# EAGLE board The_project v138 (EAGLE 9.7.0)
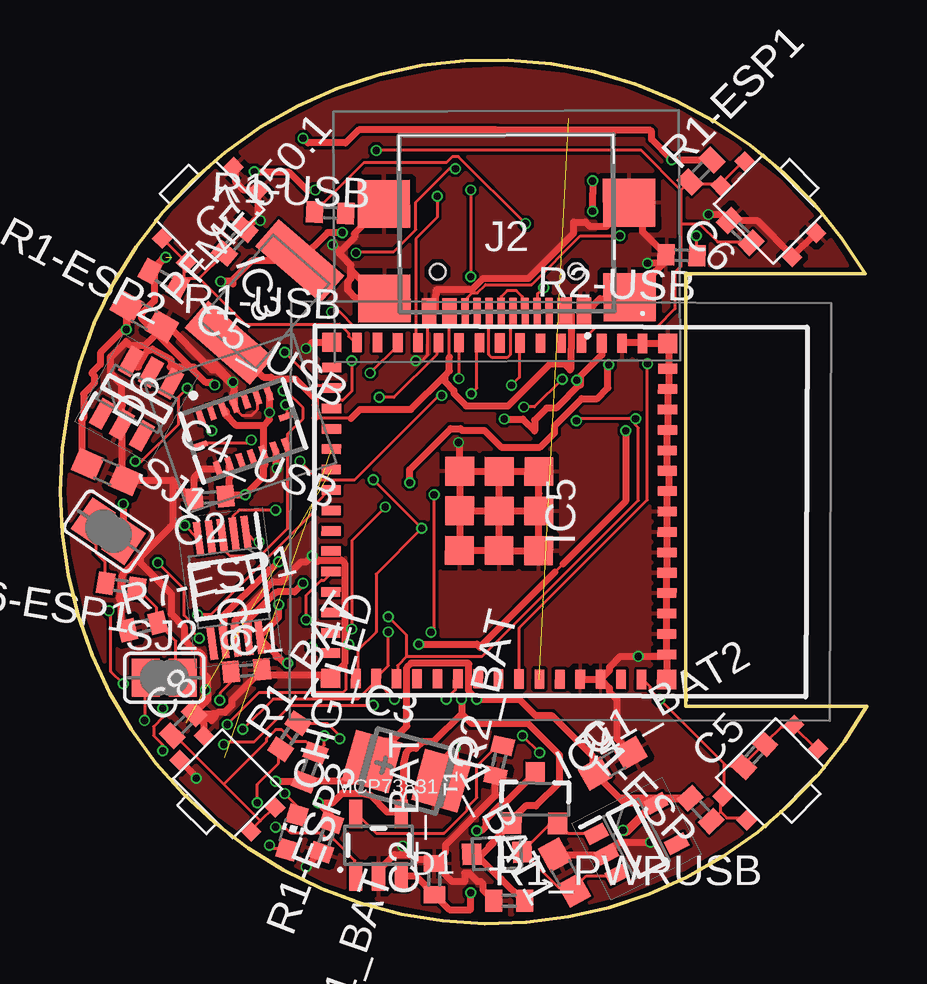
[diagram p0: board, top side]
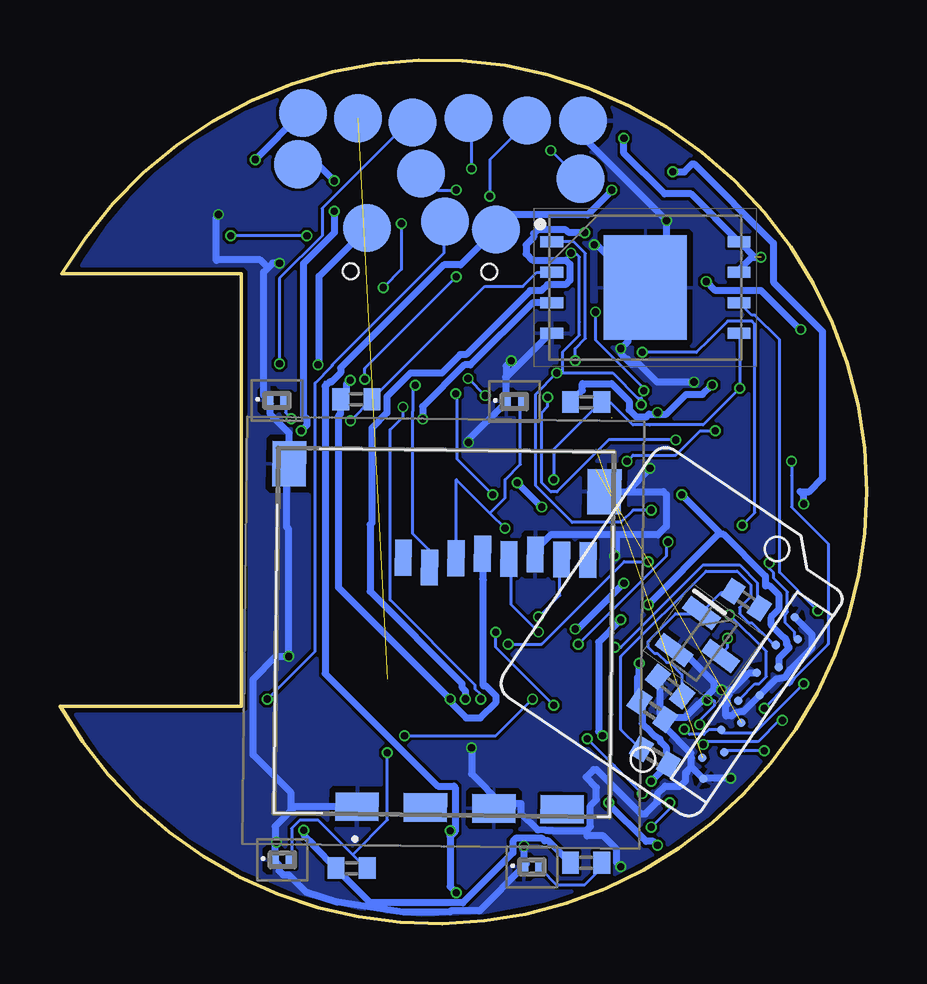
[diagram p1: board, bottom side, seen from below]

Size 33.62 x 35.98 mm. Coordinates in mm from the lower left corner, seen from the top.
Outline: 0,18 arc150 33.62,9.06 26.08,9.06 26.08,27.07 33.54,27.07 arc150 0,18
Copper layers (1*16): Top / Bottom
Stack-up Default Layer Stack: Top User Defined 0.035mm / Dielectric-1 User Defined 1.6mm / Bottom User Defined 0.035mm
Design rules: minimum copper width 5mil, minimum drill size 0.3mm, copper clearance wire_polygon to wire_polygon 5mil, copper clearance wire_polygon to pad_smd 5mil, copper clearance wire_polygon to via 5mil, copper clearance pad_smd to pad_smd 5mil, copper clearance pad_smd to via 5mil, copper clearance via to via 5mil, copper clearance smd to pad (same net) 5mil, copper clearance smd to via (same net) 5mil, copper clearance smd to smd (same net) 5mil, dimension clearance 0.2mm, via restrict clearance 0mil, restrict clearance 0mil, drill distance 6mil, keepout clearance 0mil

## Footprints (pad centres in the part's own frame; a part is rotated, then mirrored left to right if it is on the bottom)
RRR = smd 0.62 x 0.6: P$1 -2.1,0.71; P$2 -2.1,-0.71; P$3 2.1,0.71; P$4 2.1,-0.71
EAGLE-LTSPICE_C0402 = smd 0.7 x 0.9: 1 -0.65,0; 2 0.65,0
RCL_C0603 = smd 1.1 x 1: 1 -0.85,0; 2 0.85,0
CT3528 = smd 2 x 2.2: + -1.5,0; - 1.5,0
ADAFRUIT_CHIP-LED0603 = smd 0.8 x 0.8: A 0,-0.75; C 0,0.75
AVX---SD0805S020S1R0_AVX_SD0805S020S1R0_0 = smd 0.8 x 0.9: 1 -1.05,0; 2 1.05,0
PESD5V0S1BL315 = smd 0.4 x 0.7: 1 -0.35,0; 2 0.35,0
SOT95P280X145-6N = smd 1.2 x 0.6: 1 -1.25,0.95; 2 -1.25,0; 3 -1.25,-0.95; 4 1.25,-0.95; 5 1.25,0; 6 1.25,0.95
SON127P800X600X80-9N = smd 0.95 x 0.45: 1 -3.9,1.905; 2 -3.9,0.635; 3 -3.9,-0.635; 4 -3.9,-1.905; 5 3.9,-1.905; 6 3.9,-0.635; 7 3.9,0.635; 8 3.9,1.905 | smd 3.45 x 4.35: 9 0,0
BMI085 = smd 0.675 x 0.25: 1 1.165,1.5; 2 1.165,1; 3 1.165,0.5; 4 1.165,0; 5 1.165,-0.5; 6 1.165,-1; 7 1.165,-1.5; 9 -1.165,-1.5; 10 -1.165,-1; 11 -1.165,-0.5; 12 -1.165,0; 13 -1.165,0.5; 14 -1.165,1; 15 -1.165,1.5 | smd 0.25 x 0.675: 8 0,-1.915; 16 0,1.915
SOT95P280X120-5N = smd 0.9 x 0.6: 1 -1.4,0.95; 2 -1.4,0; 3 -1.4,-0.95; 4 1.4,-0.95; 5 1.4,0.95
ESP32S3MINI1N8 = smd 0.8 x 0.4: 1 -7,5.95; 2 -7,5.1; 3 -7,4.25; 4 -7,3.4; 5 -7,2.55; 6 -7,1.7; 7 -7,0.85; 8 -7,0; 9 -7,-0.85; 10 -7,-1.7; 11 -7,-2.55; 12 -7,-3.4; 13 -7,-4.25; 14 -7,-5.1; 15 -7,-5.95; 31 7,-5.95; 32 7,-5.1; 33 7,-4.25; 34 7,-3.4; 35 7,-2.55; 36 7,-1.7; 37 7,-0.85; 38 7,0; 39 7,0.85; 40 7,1.7; 41 7,2.55; 42 7,3.4; 43 7,4.25; 44 7,5.1; 45 7,5.95 | smd 0.4 x 0.8: 16 -5.95,-7; 17 -5.1,-7; 18 -4.25,-7; 19 -3.4,-7; 20 -2.55,-7; 21 -1.7,-7; 22 -0.85,-7; 23 0,-7; 24 0.85,-7; 25 1.7,-7; 26 2.55,-7; 27 3.4,-7; 28 4.25,-7; 29 5.1,-7; 30 5.95,-7; 46 5.95,7; 47 5.1,7; 48 4.25,7; 49 3.4,7; 50 2.55,7; 51 1.7,7; 52 0.85,7; 53 0,7; 54 -0.85,7; 55 -1.7,7; 56 -2.55,7; 57 -3.4,7; 58 -4.25,7; 59 -5.1,7; 60 -5.95,7 | smd 1.2 x 1.2: 61 0,0; 66 -1.65,1.65; 67 -1.65,0; 68 -1.65,-1.65; 69 0,-1.65; 70 1.65,-1.65; 71 1.65,0; 72 1.65,1.65; 73 0,1.65 | smd 0.8 x 0.8: 62 -7,7; 63 -7,-7; 64 7,-7; 65 7,7
SOP50P490X110-10N = smd 1.4 x 0.3: 1 -2.2,1; 2 -2.2,0.5; 3 -2.2,0; 4 -2.2,-0.5; 5 -2.2,-1; 6 2.2,-1; 7 2.2,-0.5; 8 2.2,0; 9 2.2,0.5; 10 2.2,1
LCD = smd 0.35 x 0.35: P$1 4,3.35; P$2 4.62,2.65; P$3 4,1.95; P$4 4.62,1.25; P$5 4,0.55; P$6 4.62,-0.15; P$7 4,-0.85; P$8 4.62,-1.55; P$9 4.1,-2.25; P$10 4.72,-2.95; P$11 4.1,-3.65; P$12 4.62,-4.35
USB4110GFA = smd 0.3 x 1.15: A1 -3.35,3.678; A4 -2.55,3.678; A5 -1.25,3.678; A6 -0.25,3.678; A7 0.25,3.678; A8 1.25,3.678; A9 2.55,3.678; A12 3.4,3.678; B1 3.1,3.678; B4 2.25,3.678; B5 1.75,3.678; B6 0.75,3.678; B7 -0.75,3.678; B8 -1.75,3.678; B9 -2.25,3.678; B12 -3.05,3.678 | smd 2.18 x 2: MP1 -5.11,-0.827; MP2 5.11,-0.827; MP3 -5.11,3.103; MP4 5.11,3.103 | hole 0.65: -2.89,2.003; 2.89,2.003
112ATAARR03ATTEND = smd 1.8 x 1.2: G1 10.6,10.4; G2 4.9,10.4; S1 7.75,10.4; S2 2.05,10.4 | smd 1.4 x 1.9: G3 13.6,-3.85; G4 0.45,-2.85 | smd 0.7 x 1.5: P1 8.8,0; P2 7.7,0.4; P3 6.6,0; P4 5.5,-0.2; P5 4.4,0; P6 3.3,-0.2; P7 2.2,0; P8 1.1,0
SPARKFUN-IC-POWER_SOT23-5 = smd 0.55 x 1.2: 1 -0.95,-1.3; 2 0,-1.3; 3 0.95,-1.3; 4 0.95,1.3; 5 -0.95,1.3
VARISTOR_CT/CN1812 = smd 1.5 x 3.6: 1 -2.25,0; 2 2.25,0
SOT96P240X120-3N = smd 1.55 x 0.65: 1 -0.85,0.96; 2 -0.85,-0.96; 3 0.85,0
EAGLE-LTSPICE_R0402 = smd 0.7 x 0.9: 1 -0.65,0; 2 0.65,0
SJ = smd 1.168 x 1.6: 1 -0.762,0; 2 0.762,0
SPARKFUN-DISCRETESEMI_SOT23-3 = smd 0.8 x 0.9: 1 -0.95,-1; 2 0.95,-1; 3 0,1.1
TP20R = smd 2 x 2: TP 0,0

## Placement (x,y rotation side)
BUTTON1  [RRR]  6.25,29.53 225 top
BUTTON2  [RRR]  6.98,5.83 315 top
BUTTON3  [RRR]  29.6,6.29 45 top
BUTTON4  [RRR]  29.52,29.77 135 top
C1  1uF  [EAGLE-LTSPICE_C0402]  7.77,10.55 5.2 top
C1_BAT  4.7uF  [EAGLE-LTSPICE_C0402]  11.09,3.58 251 top
C1_BAT1  4.7uF  [RCL_C0603]  21.02,2.12 118.7 top
C1_BAT2  4.7uF  [RCL_C0603]  23.03,6.68 30.2 top
C2  1uF  [EAGLE-LTSPICE_C0402]  6.25,17.76 184.8 top
C2_BAT  4.7uF  [EAGLE-LTSPICE_C0402]  15.6,1.85 90 top
C3  100uF  [CT3528]  14.45,6.35 344.4 top
C4  100nF  [EAGLE-LTSPICE_C0402]  8.94,8.88 325.2 bottom
C4_USB  100nF  [RCL_C0603]  1.93,18.82 336.4 top
C5  1uF  [EAGLE-LTSPICE_C0402]  28.91,7.01 227.5 top
C5_USB  4.7uF  [RCL_C0603]  3.51,25.3 330.1 top
C6  100nF  [EAGLE-LTSPICE_C0402]  28.34,28.84 134.7 top
C7  100nF  [EAGLE-LTSPICE_C0402]  7.28,28.42 49.3 top
C8  100nF  [EAGLE-LTSPICE_C0402]  5.13,8.29 45 top
CHG_LED  [ADAFRUIT_CHIP-LED0603]  9.67,3.8 344 top
D1  AVX---SD0805S020S1R0_AVX_SD0805S020S1R0AVX_SD0805S020S1R0_0_0  [AVX---SD0805S020S1R0_AVX_SD0805S020S1R0_0]  18.21,2.94 182.5 top
D2  PESD3V3S1BLYL  [PESD5V0S1BL315]  24.58,21.8 0 bottom
D3  PESD3V3S1BLYL  [PESD5V0S1BL315]  14.68,21.75 0 bottom
D4  PESD3V3S1BLYL  [PESD5V0S1BL315]  24.36,2.66 0 bottom
D5  PESD3V3S1BLYL  [PESD5V0S1BL315]  13.96,2.36 0 bottom
D6  USBLC6-2SC6Y  [SOT95P280X145-6N]  3.19,21.88 60.9 top
IC2  W25Q256JVEIQ  [SON127P800X600X80-9N]  9.23,26.5 0 bottom
IC3  BMI085  [BMI085]  7.63,20.53 108.7 top
IC4  XC6220A331MR-G  [SOT95P280X120-5N]  24.02,3.53 27.2 top
IC5  ESP32-S3-MINI-1-N8  [ESP32S3MINI1N8]  18.3,17.19 269.8 top
IC6  DRV2605LDGST  [SOP50P490X110-10N]  7.05,14 277.5 top
J1  PCA-6-LA-12-HL-3-T_RECRANN  [LCD]  8.2,12.24 325.9 bottom
J2  USB4110-GF-A  [USB4110GFA]  18.61,29.18 180.3 top
J3  112A-TAAR-R03_ATTEND  [112ATAARR03ATTEND]  10.52,15.14 179.3 bottom
MCP73831  SPARKFUN-IC-POWER_MCP73831  [SPARKFUN-IC-POWER_SOT23-5]  13.27,3.27 0 top
PFMF.050.1  500mA  [VARISTOR_CT/CN1812]  8.51,25.91 49.1 top
Q1  2N7002  [SOT96P240X120-3N]  6.78,11.66 323.6 bottom
R1-ESP  10k  [EAGLE-LTSPICE_R0402]  26.69,4.75 132.7 top
R1-ESP1  10k  [EAGLE-LTSPICE_R0402]  26.71,31.36 45 top
R1-ESP2  10k  [EAGLE-LTSPICE_R0402]  4.32,26.87 151.9 top
R1-ESP3  10k  [EAGLE-LTSPICE_R0402]  10.4,6.51 248.7 top
R1-USB  5K1  [EAGLE-LTSPICE_R0402]  11.26,29.62 177.5 top
R1_BAT  200  [EAGLE-LTSPICE_R0402]  9.56,7.8 56.1 top
R1_PWRUSB  100k  [EAGLE-LTSPICE_R0402]  18.72,0.96 0 top
R2-USB  5K1  [EAGLE-LTSPICE_R0402]  25.9,27.85 178.2 top
R2_BAT  2K  [EAGLE-LTSPICE_R0402]  18.29,6.78 76.8 top
R4  10k  [EAGLE-LTSPICE_R0402]  11.7,2.54 0 bottom
R5  10k  [EAGLE-LTSPICE_R0402]  21.47,2.31 0 bottom
R6  10k  [EAGLE-LTSPICE_R0402]  11.7,21.73 0 bottom
R6-ESP1  100K  [EAGLE-LTSPICE_R0402]  2.54,14.08 170.7 top
R7-ESP1  100K  [EAGLE-LTSPICE_R0402]  3.44,12.38 13.6 top
R8  10k  [EAGLE-LTSPICE_R0402]  21.27,21.85 0 bottom
R9  22  [EAGLE-LTSPICE_R0402]  8.83,6.96 149.6 bottom
R11  10K  [EAGLE-LTSPICE_R0402]  5.03,13.49 326.8 bottom
R12  10K  [EAGLE-LTSPICE_R0402]  8.2,9.88 321.5 bottom
SJ1  [SJ]  2.02,16.36 325.8 top
SJ2  [SJ]  4.34,10.25 0 top
T1  9A/30V/15mΩ  [SPARKFUN-DISCRETESEMI_SOT23-3]  19.79,5.19 359.5 top
TP1  TPTP20R  [TP20R]  20.82,28.98 0 bottom
TP2  TPTP20R  [TP20R]  23.7,31.64 0 bottom
TP3  TPTP20R  [TP20R]  23.51,33.77 0 bottom
TP4  TPTP20R  [TP20R]  11.83,33.45 0 bottom
TP5  TPTP20R  [TP20R]  15.46,28.92 0 bottom
TP6  TPTP20R  [TP20R]  16.6,33.56 0 bottom
TP7  TPTP20R  [TP20R]  14.17,33.46 0 bottom
TP8  TPTP20R  [TP20R]  18.59,31.26 0 bottom
TP9  TPTP20R  [TP20R]  17.58,29.25 0 bottom
TP10  TPTP20R  [TP20R]  11.93,31.04 0 bottom
TP11  TPTP20R  [TP20R]  21.2,33.56 0 bottom
TP12  TPTP20R  [TP20R]  18.93,33.39 0 bottom

## Library data of the parts
BUTTON1-BUTTON4 = MY_BTN
C1 C1_BAT C2 C2_BAT C4-C8 = Hector_Watch; SPICEMODEL: NONE; SPICEPREFIX: C
C1_BAT1 C1_BAT2 C3 C4_USB C5_USB = Hector_Watch; SPICEPREFIX: C
CHG_LED PFMF.050.1 SJ1 SJ2 TP1-TP12 = Hector_Watch
D1 = Hector_Watch; CENTROID_NOT_SPECIFIED: No; DATASHEET: http://datasheets.avx.com/schottky.pdf; DIGIKEY_DESCRIPTION: DIODE SCHOTTKY 20V 1A 0805; DIGIKEY_PART_NUMBER: 478-7800-1-ND; LEAD_FREE: yes; MF: AVX; MOUSER_PART_NUMBER: 581-SD0805S020S1R0; MPN: SD0805S020S1R0; PACKAGE: 0805 (2012 metric); PREFIX: D; ROHS: yes; TEMPERATURE_RANGE_HIGH: +125°C; TEMPERATURE_RANGE_LOW: -55°C
D2-D5 = Hector_Watch; ARROW_PART_NUMBER: PESD3V3S1BLYL; ARROW_PRICE-STOCK: https://www.arrow.com/en/products/pesd3v3s1blyl/nexperia?region=nac; DESCRIPTION: PESD3V3S1BL - Low capacitance bidirectional ESD protection diode; HEIGHT: 0mm; MANUFACTURER_NAME: Nexperia; MANUFACTURER_PART_NUMBER: PESD3V3S1BLYL; MOUSER_PART_NUMBER: 771-PESD3V3S1BLYL; MOUSER_PRICE-STOCK: https://www.mouser.co.uk/ProductDetail/Nexperia/PESD3V3S1BLYL?qs=vLWxofP3U2zWoKHYJMVoKQ%3D%3D
D6 = Hector_Watch; ARROW_PART_NUMBER: USBLC6-2SC6Y; ARROW_PRICE-STOCK: https://www.arrow.com/en/products/usblc6-2sc6y/stmicroelectronics?region=nac; DESCRIPTION: Low Cap. ESD Protection Auto SOT-23-6 STMicroelectronics USBLC6-2SC6Y, Dual Uni-Directional TVS Diode Array, 6-Pin SOT-23; HEIGHT: 1.45mm; MANUFACTURER_NAME: STMicroelectronics; MANUFACTURER_PART_NUMBER: USBLC6-2SC6Y; MOUSER_PART_NUMBER: 511-USBLC6-2SC6Y; MOUSER_PRICE-STOCK: https://www.mouser.co.uk/ProductDetail/STMicroelectronics/USBLC6-2SC6Y?qs=gNDSiZmRJS%2FOgDexvXkdow%3D%3D
IC2 = Hector_Watch; ARROW_PART_NUMBER: W25Q256JVEIQ; ARROW_PRICE-STOCK: https://www.arrow.com/en/products/w25q256jveiq/winbond-electronics?region=nac; DESCRIPTION: 256M-bit Serial Flash Memory with uniform 4KB sectors and Dual/Quad SPI; HEIGHT: 0.8mm; MANUFACTURER_NAME: Winbond; MANUFACTURER_PART_NUMBER: W25Q256JVEIQ; MOUSER_PART_NUMBER: 454-W25Q256JVEIQ; MOUSER_PRICE-STOCK: https://www.mouser.co.uk/ProductDetail/Winbond/W25Q256JVEIQ?qs=qSfuJ%252Bfl%2Fd4o%2FNFUf7yCgA%3D%3D
IC3 = Hector_Watch; ARROW_PART_NUMBER: BMI085; ARROW_PRICE-STOCK: https://www.arrow.com/en/products/bmi085/bosch; DESCRIPTION: IMUs - Inertial Measurement Units High-performance IMU BMI085 for virtual and augmented reality applications; HEIGHT: 1mm; MANUFACTURER_NAME: BOSCH; MANUFACTURER_PART_NUMBER: BMI085; MOUSER_PART_NUMBER: 262-BMI085; MOUSER_PRICE-STOCK: https://www.mouser.co.uk/ProductDetail/Bosch-Sensortec/BMI085?qs=y6ZabgHbY%252ByGCM8LfWZyqA%3D%3D
IC4 = Hector_Watch; DESCRIPTION: LDO Voltage Regulators; HEIGHT: 1.2mm; MANUFACTURER_NAME: Torex; MANUFACTURER_PART_NUMBER: XC6220A331MR-G; MOUSER_PART_NUMBER: 865-XC6220A331MR-G; MOUSER_PRICE-STOCK: https://www.mouser.co.uk/ProductDetail/Torex-Semiconductor/XC6220A331MR-G?qs=AsjdqWjXhJ8ZSWznL1J0gg%3D%3D
IC5 = Hector_Watch; DESCRIPTION: WiFi Development Tools - 802.11 [Engineering Samples] SMD Module, ESP32-S3FN8, 8 MB SPI Flash, PCB Antenna; HEIGHT: 2.55mm; MANUFACTURER_NAME: Espressif Systems; MANUFACTURER_PART_NUMBER: ESP32-S3-MINI-1-N8; MOUSER_PART_NUMBER: 356-ESP32-S3-MINI1N8; MOUSER_PRICE-STOCK: https://www.mouser.co.uk/ProductDetail/Espressif-Systems/ESP32-S3-MINI-1-N8?qs=XAiT9M5g4x82rl6F%2FIYUQg%3D%3D
IC6 = Hector_Watch; ARROW_PART_NUMBER: DRV2605LDGST; ARROW_PRICE-STOCK: https://www.arrow.com/en/products/drv2605ldgst/texas-instruments?region=nac; DESCRIPTION: ERM & LRA Device Haptic Driver 2-5V BGA9 Texas Instruments DRV2605LDGST Piezo Haptic Motor Driver IC, 5 V, 10-Pin VSSOP; HEIGHT: 1.1mm; MANUFACTURER_NAME: Texas Instruments; MANUFACTURER_PART_NUMBER: DRV2605LDGST; MOUSER_PART_NUMBER: 595-DRV2605LDGST; MOUSER_PRICE-STOCK: https://www.mouser.co.uk/ProductDetail/Texas-Instruments/DRV2605LDGST?qs=asCBFxFfL1TjvcNdZsR2BA%3D%3D
J1 = Library3
J2 = Library; DESCRIPTION: CONN USB 2.0 TYPE-C R/A SMT; HEIGHT: 3.26mm; MANUFACTURER_NAME: GCT (GLOBAL CONNECTOR TECHNOLOGY); MANUFACTURER_PART_NUMBER: USB4110-GF-A; MOUSER_PART_NUMBER: 640-USB4110-GF-A; MOUSER_PRICE-STOCK: https://www.mouser.co.uk/ProductDetail/GCT/USB4110-GF-A?qs=KUoIvG%2F9IlYiZvIXQjyJeA%3D%3D
J3 = Hector_Watch; DESCRIPTION: Micro SD Card Socket, Push-Push Type, Top Mount, SMT, H=1.83mm, 10u; HEIGHT: 1.9mm; MANUFACTURER_NAME: ATTEND; MANUFACTURER_PART_NUMBER: 112A-TAAR-R03 ATTEND
MCP73831 = Hector_Watch; PROD_ID: IC-09995
Q1 = Hector_Watch; ARROW_PART_NUMBER: 2N7002; ARROW_PRICE-STOCK: https://www.arrow.com/en/products/2n7002/on-semiconductor?region=europe; DESCRIPTION: N-channel MOSFET,2N7002 0.115A 60V; HEIGHT: 1.2mm; MANUFACTURER_NAME: onsemi; MANUFACTURER_PART_NUMBER: 2N7002; MOUSER_PART_NUMBER: 512-2N7002; MOUSER_PRICE-STOCK: https://www.mouser.co.uk/ProductDetail/onsemi-Fairchild/2N7002?qs=0dwsXDNhqlz66WJJhrTFjQ%3D%3D
R1-ESP R1-ESP1-R1-ESP3 R1-USB R1_BAT R1_PWRUSB R2-USB R2_BAT R4-R6 R6-ESP1 R7-ESP1 R8 R9 R11 R12 = Hector_Watch; SPICEMODEL: NONE; SPICEPREFIX: R
T1 = Hector_Watch; PROD_ID: TRANS-14715

## Nets
3V3: C1_BAT2.1 C2.1 C3.+ C4.1 IC2.3 IC2.7 IC2.8 IC3.3 IC3.7 IC3.11 IC3.14 IC4.5 IC5.3 IC6.10 J1.P$4 J3.P4 R1-ESP1.2 R1-ESP2.2 R1-ESP3.2 R1-ESP.2 R4.1 R5.1 R6.1 R8.1 R9.1 TP3.TP
ADC_BAT: IC5.9 SJ2.1
BOOT: BUTTON4.P$3 BUTTON4.P$4 C6.1 IC5.4 R1-ESP1.1 TP10.TP
BUTTON1: BUTTON1.P$3 BUTTON1.P$4 C7.1 IC5.15 R1-ESP2.1
BUTTON2: BUTTON2.P$3 BUTTON2.P$4 C8.1 IC5.26 R1-ESP3.1
D+: IC5.24
D-: IC5.23
DISP_RST: IC5.20 J1.P$11
DN: J2.A7 J2.B7
DP: J2.A6 J2.B6
EN_DRV: IC5.17 IC6.5
GND: BUTTON1.P$1 BUTTON1.P$2 BUTTON2.P$1 BUTTON2.P$2 BUTTON4.P$1 BUTTON4.P$2 C1.2 C1_BAT1.2 C1_BAT2.2 C1_BAT.2 C2.2 C2_BAT.2 C3.- C4.2 C4_USB.2 C5_USB.2 C6.2 C7.2 C8.2 D2.1 D3.1 D4.1 D5.1 D6.2 IC2.4 IC2.9 IC3.4 IC3.6 IC3.10 IC3.15 IC4.2 IC5.1 IC5.2 IC5.42 IC5.43 IC5.46 IC5.47 IC5.48 IC5.49 IC5.50 IC5.51 IC5.52 IC5.53 IC5.54 IC5.55 IC5.56 IC5.57 IC5.58 IC5.59 IC5.60 IC5.61 IC5.62 IC5.63 IC5.64 IC5.65 IC5.66 IC5.67 IC5.68 IC5.69 IC5.70 IC5.71 IC5.72 IC5.73 IC6.8 J1.P$1 J1.P$5 J1.P$6 J1.P$12 J2.A1 J2.A12 J2.B1 J2.B12 J2.MP1 J2.MP2 J2.MP3 J2.MP4 J3.G1 J3.G2 J3.G3 J3.G4 J3.P6 MCP73831.2 Q1.2 R1_PWRUSB.1 R2-USB.2 R2_BAT.1 R7-ESP1.1 R12.1 TP4.TP
ID_DRV: IC6.4
IMU_INT1: IC3.16 IC5.11
IMU_INT2: IC3.1 IC5.10
IN_DRV: IC5.16
LEDA: J1.P$3 R9.2
LEDK: J1.P$2 Q1.3
MISO: D2.2 IC2.2 IC5.33 J3.P7 R8.2
MOSI: D3.2 IC2.5 IC5.31 J1.P$10 J3.P3 R6.2
N$1: R1-USB.1
N$3: J2.A5 R1-USB.2
N$4: C1_BAT1.1 D1.1 IC4.1 IC4.3 T1.2
N$5: D6.1
N$6: D6.4
N$7: R6-ESP1.2 SJ1.1
N$9: Q1.1 R11.1 R12.2
N$10: R6-ESP1.1 R7-ESP1.2 SJ2.2
N$11: J2.B5 R2-USB.1
N$12: CHG_LED.C R1_BAT.2
N$13: C1.1 IC6.1
N$14: D6.5
N$15: J2.B9
N$16: MCP73831.1 R1_BAT.1
N$17: D6.6
N$18: MCP73831.5 R2_BAT.2
N$19: D6.3
PIN_LED: IC5.30 R11.2
PPG_INT: IC5.36 TP8.TP
RESET: BUTTON3.P$1 BUTTON3.P$2 BUTTON3.P$3 BUTTON3.P$4 C5.1 C5.2 IC5.45 R1-ESP.1 TP9.TP
RX: IC5.40 TP11.TP
SCK: D4.2 IC2.6 IC5.32 J1.P$9 J3.P5 R5.2
SCL: IC3.8 IC5.13 IC6.2 TP6.TP
SDA: IC3.9 IC5.12 IC6.3 TP7.TP
SS: D5.2 R4.2
SS_FLASH: IC2.1 IC5.18
SS_SD: IC5.7 J3.P2
SS_TFT: IC5.21 J1.P$8
TFT_DC: IC5.22 J1.P$7
TX: IC5.39 TP12.TP
VBAT: C2_BAT.1 MCP73831.3 SJ1.2 T1.3 TP5.TP
VBUS: C1_BAT.1 C4_USB.1 C5_USB.1 CHG_LED.A D1.2 MCP73831.4 PFMF.050.1.2 R1_PWRUSB.2 T1.1
VIBE_OUT+: IC6.9 TP1.TP
VIBE_OUT-: IC6.7 TP2.TP
VUSB: J2.A4 J2.A9 J2.B4 PFMF.050.1.1

## Tracks (layer width: path | path; a pad name or v marks a point on that pad's centre or on a via)
3V3  (via drill 0.3)  (1 unrouted)
  Top 0.127: IC5.3 22.57,24.09 | 8.35,11.9 IC6.10 8.34,12 8.35,12.02 | 26,5.04 26.13,5.17 R1-ESP.2 | 24.86,5.04 | 24.86,5.04 IC4.5 | 22.32,6.18 C1_BAT2.1 22.19,6.31 22.01,6.31 | IC4.5 24.73,5.04 | 10.25,5.93 R1-ESP3.2 10.13,5.93 | 12.92,6.69 C3.+ 13.05,6.82 | 16.98,9.74 17.04,9.68 | 24.73,4.91 IC4.5 | 27.14,31.84 R1-ESP1.2 | 3.78,27.26 R1-ESP2.2 3.78,27.14 | 7.08,19.01 IC3.14 | IC3.11 8.47,19.52 | 7.08,21.17 6.82,21.42 IC3.3 | 8.73,21.35 v8.73,21.29 | 8.73,22.06 IC3.7 | 6.95,17.87 7.08,17.87 C2.1 6.95,17.87
  Top 0.3: 12.16,5.93 11.8,5.93 | 11.8,5.93 10.25,5.93 v8.98,5.93 | 13.84,7.61 13.01,6.78 C3.+ 12.94,6.69 12.92,6.69 | 13.84,7.61 14.46,8.23 14.46,10.68 14.63,10.85 17,10.85 17.04,10.82 17.04,9.68 v17.36,9.36 19.13,9.36 19.8,8.68 20.48,8.68 22.19,6.97 22.19,6.31 | 11.8,5.93 13.49,7.61 13.84,7.61 | v10.13,32.72 10.32,32.53 11.9,32.53 12.45,33.08 18.18,33.08 18.2,33.05 24.6,33.05 24.65,33 24.65,32.67 v25.49,31.84 27.14,31.84 | v4.41,27.77 4.32,27.68 | 4.32,27.68 3.89,27.25 3.77,27.25 | 3.76,25.78 3.93,25.95 3.93,27 R1-ESP2.2 4.26,27.68 4.32,27.68 | 3.76,25.78 3.7,25.68 | 3.7,25.68 | 3.76,25.78 3.39,25.42 3.39,25.23 6.06,22.56 6.33,22.56 v6.45,22.44 | IC3.14 7.06,18.8 7.11,18.65 7.06,18.54 7.06,17.98 C2.1 6.95,17.87 v7.71,17.87 8.46,18.61 | 8.46,18.61 8.46,18.98 | 8.46,18.61 8.48,18.63 8.48,19.02 8.53,19.13 8.48,19.28 | IC3.11 8.48,19.28 | IC3.11 8.48,19.64 8.47,19.64 IC3.11 | IC3.3 6.94,21.32 6.94,21.16 7.35,20.75 8.48,20.75 | 8.48,20.75 8.48,20.18 8.48,19.28 | 8.48,20.75 8.73,21 8.73,21.35 8.73,21.65 8.73,21.66 8.73,21.67 8.73,22.07 IC3.7 | v9.11,13.29 9.11,12.77 8.34,12 | 9,11.22 9,11.14 9.03,11.1 | IC6.10 8.33,11.89 9,11.22 | IC5.3 22.57,23.7 21.68,22.81 | 21.68,22.81 21.68,22.49 | 21.68,22.81 v21.53,22.65 v21.53,22.64 21.68,22.49 | 21.68,22.49 21.68,22.44 | 21.68,22.49 20.67,21.48 20.28,21.48 19.78,20.98 19.78,20.53 19.29,21.02 v18.51,21.02 | C1_BAT2.1 22.43,6.12 23.32,5.23 | 23.32,5.23 23.51,5.04 24.86,5.04 | 26.2,5.2 25.01,5.2 IC4.5 23.63,3.81 23.46,3.81 | R1-ESP.2 23.32,5.23 | 24.73,5.04 23.51,3.81 23.46,3.81 | 23.46,3.81 v23.46,3.89 | 9,11.22 9.36,10.85 v9.49,10.85
  Bottom 0.127: 21.68,22.06 21.81,21.93 R8.1 21.94,21.8 | 13.17,25.87 IC2.3 | 15.97,9.86 15.97,9.9 | 15.97,15.33 J3.P4 | 22.06,2.24 R5.1 22.19,2.37 | 8.35,6.69 R9.1 8.35,6.56 | 9.36,9.23 C4.1 9.49,9.36 | 23.59,33.74 TP3.TP | 5.3,27.26 IC2.7 | 5.3,28.41 IC2.8 5.43,28.53 | 12.28,21.8 R6.1
  Bottom 0.3: 8.35,6.69 8.35,7.32 8.6,7.57 8.63,7.69 8.83,7.8 8.83,7.81 | 9.36,9.23 9.36,8.34 9.21,8.18 9.2,8.17 8.83,7.81 | 5.3,27.26 4.79,27.77 v4.41,27.77 | 5.3,28.41 4.66,27.77 | IC2.8 7.32,30.4 8.43,30.4 10.13,32.1 v10.13,32.72 | R6.1 11.85,22.22 11.85,22.5 10.63,22.5 9.91,21.77 9.91,21.41 9.61,21.12 9.19,21.12 9.08,21.23 8.73,21.23 | 8.73,21.23 8.35,21.23 7.53,22.05 6.85,22.05 6.46,22.44 v6.45,22.44 | v8.73,21.29 8.73,21.23 | 21.81,21.93 21.94,21.8 21.94,21.24 22.02,21.16 22.02,14.01 v17.36,9.36 17.36,9.24 16.7,8.58 16.1,8.58 15.45,9.23 15.45,9.48 15.88,9.9 15.97,9.9 15.98,9.91 15.98,14.33 | R8.1 21.68,22.09 21.68,22.49 v21.53,22.64 | IC2.3 13.93,25.87 16.52,23.28 16.77,23.28 18.51,21.54 v18.51,21.02 | 9.49,9.36 9.56,9.42 9.56,10.25 9.49,10.32 v9.49,10.85 | 8.83,7.81 8.71,7.73 | 8.71,7.73 | 8.71,7.73 8.68,7.72 | 8.68,7.72 | J1.P$4 3.65,10.71 3.65,11.08 3.52,11.21 3.25,11.48 3.25,11.53 3.33,11.6 3.33,11.73 3.35,11.76 3.35,11.8 3.38,11.83 3.39,11.88 3.52,11.97 3.98,12.43 3.98,12.77 3.92,12.86 3.65,13.13 3.65,13.68 4.05,14.08 4.23,14.08 4.23,14.48 5.97,16.21 6.19,16.21 | v9.11,13.29 6.19,16.21 | 6.19,16.21 6.19,16.34 v7.71,17.87 | R9.1 v8.98,5.93 | R4.1 13.27,3.45 13.43,3.45 13.55,3.58 14.6,3.58 14.75,3.43 14.75,2.95 16.84,0.87 20.69,0.87 22.19,2.37 | R5.1 23.08,3.27 23.08,3.3 23.46,3.68 v23.46,3.89 | TP3.TP 23.56,33.77 v25.49,31.84 | 15.98,14.33 15.98,14.75 | J3.P4 16.02,14.37 15.98,14.33
ADC_BAT  (via drill 0.3)
  Top 0.127: v13.05,9.1 9.62,9.1 8.09,7.58 6.94,7.58 v6.82,7.46 | v3.52,8.47 3.52,10.12 SJ2.1 | IC5.9 17.36,24.09 17.36,22.31 v17.13,22.08 | v15.46,12.15 15.59,12.27 v15.59,17.87
  Bottom 0.127: v13.05,9.1 15.46,11.52 v15.46,12.15 | v3.52,8.47 3.65,8.47 4.54,7.58 6.71,7.58 v6.82,7.46 | v15.59,17.87 17.07,19.35 17.07,22.02 v17.13,22.08
BOOT  (via drill 0.3)
  Top 0.127: 27.52,30.82 26.25,30.82 R1-ESP1.1 26.13,30.82 25.87,30.57 | 27.52,30.82 28.41,31.71 BUTTON4.P$4 | 27.52,30.82 BUTTON4.P$3 | 25.87,30.57 25.87,29.17 | 25.87,29.17 25.87,27.39 25.62,27.14 25.62,25.61 24.86,24.85 22.32,24.85 22.06,24.6 22.06,24.47 21.81,24.22 IC5.4 | 25.87,29.17 26.64,29.17 27.4,28.41 28.79,28.41 C6.1 | v13.17,32.22 24.22,32.22 25.87,30.57
  Bottom 0.127: v13.17,32.22 12.03,31.07 TP10.TP
BUTTON1
  Top 0.127: 5.17,26.88 5.17,27.52 BUTTON1.P$3 5.17,27.64 4.28,28.53 BUTTON1.P$4 | 5.17,26.88 4.92,26.63 R1-ESP2.1 5.17,26.88 | 5.81,26.88 7.71,24.98 11.65,24.98 12.03,24.6 12.03,24.47 12.28,24.22 IC5.15 | 5.17,26.88 5.81,26.88 | 5.81,26.88 6.82,27.9 C7.1
BUTTON2  (via drill 0.3)
  Top 0.127: 8.35,4.28 8.86,4.78 BUTTON2.P$3 | 8.35,4.28 7.97,3.9 BUTTON2.P$4 | 8.35,4.28 6.82,5.8 | 6.82,5.8 4.79,7.83 C8.1 | v10.25,12.66 10.25,13.67 10.89,14.31 11.01,14.31 11.27,14.56 IC5.26 | v11.01,7.83 11.01,7.45 10.76,7.2 R1-ESP3.1 10.63,7.2 10.25,7.58 9.74,7.58 9.24,8.09 8.98,8.09 8.6,7.71 8.6,7.58 6.82,5.8
  Bottom 0.3: v10.25,12.66 11.18,11.73 11.18,8 v11.01,7.83
DISP_RST  (1 unrouted)
DN
  Top 0.127: J2.A7 18.38,25.61 18.38,26.12 18.63,26.37 19.02,26.37 19.27,26.12 19.27,25.61 J2.B7
DP
  Top 0.127: J2.B6 17.87,23.71 18,23.58 18.63,23.58 18.76,23.71 18.76,25.49 J2.A6
EN_DRV  (via drill 0.3)
  Top 0.127: IC5.17 11.27,22.44 10.73,22.44 v9.36,23.81 | IC6.5 5.74,16.05 v5.19,16.6
  Bottom 0.127: v9.36,23.81 7.11,23.81 6.59,24.32 5.81,25.1 4.79,25.1 4.66,24.98 4.66,17.12 v5.19,16.6
GND  (via drill 0.3)
  Top 0.127: 5.86,8.54 5.93,8.47 6.32,8.47 | 5.93,7.83 BUTTON2.P$1 | 5.68,8.72 C8.2 | 8.73,10.25 8.63,10.35 8.47,10.5 C1.2 8.35,10.5 | 11.27,10.25 IC5.64 | 7.33,11.9 IC6.8 | 13.43,29.68 13.43,29.93 J2.MP2 | 13.17,26.12 13.28,26.12 13.43,26.12 J2.MP4 | 7.33,31.45 BUTTON1.P$2 | 7.71,29.04 C7.2 7.71,29.3 | BUTTON1.P$1 8.22,30.44 | 11.27,24.22 IC5.63 | IC3.4 7.33,21.55 7.33,21.42 7.59,21.17 7.97,21.17 8.22,21.42 IC3.6 | 4.28,24.85 C5_USB.2 | 2.63,18.5 C4_USB.2 2.76,18.37 3.01,18.37 | D6.2 2.63,20.66 | 6.57,18.88 IC3.15 | 5.68,17.74 C2.2 5.55,17.61 | 4.59,16.52 4.66,16.6 4.66,16.72 | 2.76,12.28 R7-ESP1.1 | 18.38,18.88 IC5.67 18.25,18.88 | 19.9,18.88 IC5.66 | 16.73,18.88 IC5.68 | 16.73,17.1 IC5.69 16.69,17.22 16.73,17.23 | 20.03,15.58 IC5.72 19.9,15.58 | 20.03,17.1 IC5.73 | 18.38,17.1 IC5.61 | 18.38,15.58 IC5.71 18.25,15.58 | 16.73,15.58 IC5.70 | 16.73,18.75 IC5.68 | 21.68,25.49 J2.B12 | 25.24,27.52 25.24,27.77 R2-USB.2 25.24,27.9 | 23.71,25.99 23.72,26.04 J2.MP3 | 23.46,29.68 23.71,29.93 J2.MP1 | 15.59,25.49 J2.B1 | v14.82,23.45 15.08,23.45 15.33,23.71 15.33,25.36 J2.A12 | 16.6,18.88 IC5.68 | 24.22,24.22 IC5.1 24.35,24.22 | 23.46,24.22 IC5.2 | 25.24,24.22 IC5.62 25.37,24.09 | 25.37,22.31 IC5.59 25.37,22.18 | 25.37,23.07 IC5.60 25.37,23.2 | 25.37,19.77 IC5.56 25.37,19.64 | 25.37,20.53 IC5.57 25.37,20.66 | 25.37,21.29 IC5.58 25.37,21.42 | 25.37,14.69 IC5.50 25.37,14.56 | 25.37,15.45 IC5.51 25.37,15.58 | 25.37,16.21 25.3,16.31 IC5.52 25.37,16.34 | 25.37,17.23 IC5.53 25.37,17.1 | 25.37,17.99 IC5.54 25.37,18.12 | 25.37,18.75 IC5.55 25.37,18.88 | 25.37,13.04 IC5.48 25.37,12.91 | 25.37,13.67 IC5.49 25.37,13.8 | 22.44,10.25 IC5.43 | 21.68,10.25 IC5.42 | 25.37,10.25 IC5.65
  Top 0.127: 25.37,11.13 25.35,11.15 IC5.46 | 25.37,12.02 IC5.47 | 25.37,11.26 25.31,11.24 IC5.46 | 22.57,10.25 IC5.43 | 25.24,11.13 IC5.46 | 23.71,7.2 C1_BAT2.2 | IC5.43 22.44,10.12 | 30.57,27.9 BUTTON4.P$1 30.45,27.9 | 31.46,28.79 BUTTON4.P$2 | 27.91,29.3 C6.2 | BUTTON2.P$2 5.05,6.69 | 13.89,2.84 13.94,2.88 | 13.3,2.24 13.3,1.99 MCP73831.2 | 15.59,2.63 C2_BAT.2 15.59,2.5 15.66,2.43 | 22.7,2.88 IC4.2 22.83,3.01 | 20.67,2.88 C1_BAT1.2 | 15.97,6.05 C3.- | 24.81,27.18 24.86,27.14 | 18.03,0.95 R1_PWRUSB.1 | R2_BAT.1 | 8.98,19.72 IC3.10 | 6.94,22.66 7.09,22.51 7.26,22.51 7.26,22.34
  Top 0.3: 13.3,2.24 13.89,2.84 | 6.46,8.69 6.46,8.61 6.32,8.47 | 14.78,2.67 14.78,2.68 14.58,2.88 14.25,2.88 | 14.82,2.63 14.78,2.67 | 13.94,2.88 14.25,2.88 | v14.29,3.23 14.29,2.91 14.25,2.88 | 14.78,2.67 15.41,2.67 15.66,2.43 | R1_PWRUSB.1 17.63,1.39 17.63,1.65 17.53,1.75 17.4,1.75 17.05,2.1 16.85,2.1 16.85,1.75 16.35,1.75 C2_BAT.2 16.06,2.97 16.06,3.28 18.14,5.36 R2_BAT.1 | IC5.42 IC5.43 | IC5.43 22.9,10.55 22.9,10.69 23.34,11.13 v24.1,11.13 24.11,11.15 25.35,11.15 | IC5.43 22.89,9.81 22.89,9.66 23.2,9.35 23.2,7.71 23.71,7.2 | IC5.65 25.31,10.21 25.31,11.24 | IC5.46 IC5.47 IC5.48 | IC5.48 IC5.49 IC5.50 IC5.51 25.3,15.48 25.3,16.31 | IC5.52 IC5.53 IC5.54 | 25.37,17.99 25.37,18.81 IC5.55 IC5.56 IC5.57 IC5.58 IC5.59 | IC5.2 23.46,24.22 24.22,24.22 | IC5.1 IC5.62 25.37,24.13 25.37,23.2 | IC5.60 25.37,23.07 25.37,22.31 | J2.B12 J2.A1 22.5,26.04 23.67,26.04 | 23.67,26.04 23.72,26.04 | J2.MP3 23.75,26.12 23.84,26.12 23.82,26.1 J2.MP3 | J2.MP3 23.67,26.04 | J2.MP3 24.81,27.18 | J2.MP3 25.24,27.6 25.24,27.9 | v24.48,27.52 24.9,27.52 R2-USB.2 24.28,28.84 24.28,29.73 24.08,29.93 23.71,29.93 | v27.02,29.55 27.64,29.55 C6.2 | C6.2 29.04,29.3 30.45,27.9 | J2.MP1 23.72,29.99 22.78,29.05 22.08,29.05 21.9,29.23 21.4,29.23 21.4,28.76 19.52,26.88 17.63,26.88 17.18,26.43 15.7,26.43 15.68,26.4 15.68,26.21 15.65,26.18 15.65,25.6 J2.B1 J2.A12 | 7.33,31.45 7.33,30.89 7.65,30.57 8.22,30.57 8.22,30.53 BUTTON1.P$1 8.23,29.41 v8.35,29.3 8.08,29.3 C7.2 | J2.MP2 12.28,28.76 12.28,28.6 11.65,27.97 | 11.69,27.94 11.65,27.9 11.65,27.97 | 11.69,28.03 11.69,27.94 | 11.69,27.94 11.69,27.88 12.12,27.44 12.12,27.25 | v11.36,28.29 11.65,28 11.65,27.97
  Top 0.3: 6.53,23.07 6.33,23.07 6.05,23.35 | 6.7,23.07 6.53,23.07 | 6.05,23.35 4.53,24.88 C5_USB.2 4.25,24.8 3.55,24.1 2.9,24.1 2.75,24.25 2.1,23.6 2.11,23.59 2.11,22.93 2.58,22.46 2.58,21.67 2.6,21.59 2.58,21.55 D6.2 2.58,20.02 2.56,19.98 2.58,19.9 2.58,18.55 2.63,18.5 | 4.69,18.48 C4_USB.2 2.67,18.48 2.65,18.49 | 4.69,18.48 5.55,17.61 | 4.69,18.48 4.69,16.62 4.59,16.52 3.34,15.27 | C2.2 5.6,18.6 5.95,18.95 IC3.15 | 4.67,18.49 4.69,18.48 | 3.34,15.27 3.04,14.98 2.9,14.76 | 2.9,14.76 | 3.34,15.27 2.81,14.74 2.66,14.63 2.65,14.58 2.59,14.53 2.59,14.52 2.59,14.23 2.55,14.19 2.55,13.94 2.48,13.52 2.55,13.42 2.55,12.49 R7-ESP1.1 | v9.04,18.98 9.01,19.01 9.01,19.7 8.98,19.72 | 7.2,22.06 7.2,21.69 IC3.4 7.26,21.94 7.21,22.09 7.26,22.2 7.26,22.34 6.94,22.66 6.53,23.07 | 6.05,23.35 6.42,23.35 v7.2,22.56 7.26,22.51 | v10.25,23.96 10.51,24.22 IC5.63 | 3.34,15.27 3.34,15.04 4.63,13.75 4.63,12.9 5.17,12.36 5.17,11.82 5.67,11.32 5.8,11.32 5.97,11.16 5.97,10.44 6.15,10.25 | 6.15,10.25 6.06,10.16 v6.06,9.74 6.15,9.64 | 6.46,8.69 6.4,8.75 | 6.4,8.75 6.18,8.54 5.86,8.54 | C8.2 6.15,9.32 6.15,9.64 | 6.15,9.64 6.15,10.25 | 6.46,8.69 6.57,8.8 6.87,8.8 7.16,9.1 7.16,9.31 8.35,10.5 | C8.2 6.4,8.75 | C8.2 6,8.35 BUTTON2.P$1 | BUTTON2.P$2 5.68,6.12 v5.68,6.05 | IC6.8 7.33,12.36 7.34,12.36 7.3,12.63 7.44,12.81 7.52,12.83 8.6,13.9 8.6,13.98 8.88,14.25 9.23,14.25 10.05,15.08 10.26,15.08 v10.51,15.33 10.61,15.22 10.61,15.21 10.72,15.1 10.78,15.15 11.73,15.14 11.85,15.02 11.85,10.83 11.27,10.25 | IC5.68 16.65,17.25 16.69,17.22 | IC5.61 IC5.69 IC5.70 18.35,15.55 18.38,15.58 | IC5.61 | IC5.68 IC5.67 | IC5.67 18.33,18.84
  Top 0.3: 18.33,18.84 19.87,18.84 19.9,18.88 | 19.95,18.58 19.95,17.93 19.95,17.92 IC5.73 | 19.95,18.58 IC5.66 | IC5.71 | IC5.71 IC5.61 | IC5.71 20,15.54 20.03,15.58 | IC5.72 IC5.73 | IC5.73 IC5.61 | IC5.61 18.3,18.81 18.33,18.84 | IC5.67 19.69,18.84 19.95,18.58 | IC5.68 16.78,18.98 | IC5.68 16.65,20 v16.6,20.05 | 10.76,2.88 10.79,2.88 C1_BAT.2 10.85,2.97 v10.25,2.37 | v24.6,3.39 23.27,3.39 IC4.2 22.75,2.87 C1_BAT1.2 | J2.MP4 13.84,26.38 14.05,26.38 13.8,26.12 13.28,26.12 13.25,26.12 | 13.17,26.12 13.25,26.12 | 12.12,27.25 12.12,26.88 11.98,26.74 11.98,26.4 12.33,26.05 J2.MP4 | 12.12,27.25 13.25,26.12 | 12.73,25.35 12.73,25.45 13.35,25.45 13.52,25.62 J2.MP4 | J2.MP4 13.33,26.05 13.25,26.12 | BUTTON4.P$2 BUTTON4.P$1 | IC5.64 11.14,10.35 8.63,10.35 | C3.- 15.89,6.74 v16.48,7.32 16.48,6.53 C3.-
  Bottom 0.127: 10.51,18.12 10.89,18.12 J3.G4 | 13.81,15.45 J3.P6 | 9.36,26.37 IC2.9 | 9.36,26.37 10.25,25.49 | 8.35,27.39 9.11,26.63 IC2.9 | 11.78,32.72 11.78,33.36 TP4.TP | 9.36,26.37 9.27,26.47 IC2.9 | 14.95,21.8 D3.1 15.06,21.7 15.08,21.68 | 13.17,24.6 IC2.4 | 24.86,21.68 D2.1 24.98,21.8 | 24.1,19.26 J3.G3 24.1,19.14 | 6.7,6.05 J1.P$12 | 8.6,8.72 8.47,8.59 C4.2 8.35,8.59 | 8.6,10.25 R12.1 | 4.54,9.48 J1.P$6 4.41,9.61 | J1.P$5 4.66,10.37 | 2.89,12.66 3,12.75 J1.P$1 | 7.71,11.39 7.97,11.39 Q1.2 | 24.6,2.75 D4.1 24.66,2.65 24.6,2.63 24.6,2.37 | 21.3,4.78 J3.G1 | 15.46,4.78 J3.G2 15.59,4.91 | D5.1
  Bottom 0.3: 8.35,27.39 v8.35,29.3 11.78,32.72 | 8.6,8.72 8.6,10.25 | 7.71,11.39 6.37,10.04 6.37,9.79 | 8.35,8.59 7.56,8.59 6.37,9.79 | J3.G4 9.99,18 | 9.99,18 8.48,18 | 8.48,18 8.47,18 | 8.48,18 8.35,17.87 8.35,16.55 8.71,16.2 10.43,16.2 | 13.81,15.45 13.81,15.57 13.18,16.2 10.43,16.2 | v10.51,15.33 10.43,15.4 10.43,16.2 | 9.27,26.47 9.43,26.47 11.25,28.29 v11.36,28.29 | J3.G3 24.07,20.43 24.86,21.22 24.86,21.68 | D2.1 25.13,22 25.13,27.15 24.95,27.33 | 24.95,27.33 25.28,27.65 27.08,27.65 27.1,27.63 27.1,29.46 v27.02,29.55 | v24.48,27.52 24.76,27.52 24.95,27.33 | J1.P$5 4.91,10.45 5.62,9.74 5.75,9.74 | 5.75,9.74 v6.06,9.74 6.12,9.79 6.37,9.79 | 5.75,9.74 5.75,9.52 5.85,9.39 5.8,9.16 5.88,9.08 5.88,8.65 5.63,8.65 5.52,8.77 5.15,8.84 5.14,8.84 5.1,8.88 5.09,8.89 J1.P$6 3.78,10.2 3.77,10.2 3.41,10.27 3.2,10.58 2.28,11.5 2.28,12.04 3,12.75 | v7.2,22.56 8.74,22.56 9.48,23.3 9.8,23.3 9.98,23.48 | 9.98,23.48 9.98,23.53 | 9.98,23.48 10.25,23.75 v10.25,23.96 9.95,24.26 9.95,24.73 9.45,25.23 9.42,25.19 | 9.42,25.19 9.3,25.08 | IC2.9 9.42,26.32 9.42,25.19 | J3.G1 23.83,4.87 23.99,4.71 | 23.99,4.71 24.65,4.05 24.65,3.44 v24.6,3.39 24.66,3.33 24.66,2.65 | 23.99,4.71 23.99,5.44 25.58,7.03 25.58,10.18 24.62,11.13 v24.1,11.13 24.1,16.44 24.18,16.53 24.18,19.05 24.1,19.14 | D4.1 24.49,2.44 24.49,2.2 24.32,2.04 24.08,2.04 23.37,1.33 22.03,0.89 19.31,0.48 17.88,0.48 17.38,0.49 17.34,0.53 16.18,0.53 16.14,0.54 D5.1 14.19,2.48 | v10.25,2.37 10.43,2.55 10.43,3.1 10.98,3.65 11.65,3.65 11.65,3.85 | 15.24,5 14.4,5 14.4,4.58 13.72,3.9 13.68,3.9 13.4,3.9 13.38,3.88 13.09,3.88 13.07,3.85 11.65,3.85
  Bottom 0.3: 15.24,5 15.46,4.78 | 11.65,3.85 11.65,3.91 11.52,4.05 11.52,4.92 11.27,5.17 11.27,5.67 11.7,6.1 11.39,6.42 11.27,6.42 9.43,4.58 9.23,4.58 8.73,5.08 8.73,5.4 8.4,5.73 7.78,5.73 7.55,5.95 7.55,6.3 | 7.55,6.3 7.5,6.3 | 7.55,6.3 7.31,6.55 | v5.68,6.05 6.7,6.05 | J1.P$12 7.31,6.54 7.31,6.55 | 7.31,6.55 7.31,6.9 7.33,6.92 7.33,7.11 8.41,8.18 C4.2 | v16.48,7.32 16.48,6.24 15.24,5 | 14.19,2.48 14.19,2.63 | v14.29,3.23 14.29,2.58 14.19,2.48 | 15.06,21.7 15.06,21.69 16.6,20.15 v16.6,20.05 | D3.1 15.03,22.76 | 15.03,22.76 15.05,22.78 | v14.82,23.45 15.03,23.24 15.03,22.76 | 15.03,22.76 13.2,24.6 13.17,24.6 | v9.04,18.98 9.04,18.95 9.99,18
  pour Top: 35.23,17.4 34.03,17.4 35.28,18.65 arc90 17.93,36 arc90 -0.02,18.05 arc90 17.93,0.1 arc90
  pour Bottom: 35.53,17.4 34.03,17.4 35.23,18.6 arc90 17.93,35.9 arc90 0.18,18.15 arc90 18.23,0.1 arc90
IMU_INT1  (via drill 0.3)
  Top 0.127: v7.97,20.15 7.84,20.02 5.93,20.02 IC3.16 | IC5.11 15.71,24.09 15.71,23.73 13.91,21.93 v13.3,21.93
  Bottom 0.127: v7.97,20.15 10.76,20.15 12.92,17.99 13.17,17.99 13.55,18.37 13.55,21.29 13.3,21.55 v13.3,21.93
IMU_INT2  (via drill 0.3)
  Top 0.127: v6.32,20.53 5.93,20.91 5.93,21.04 IC3.1 | v10,19.26 10.76,18.5 12.28,18.5 15.79,22 v15.91,22 | IC5.10 16.62,22.84 v16.62,22.71
  Bottom 0.127: v6.32,20.53 6.95,20.53 7.97,19.52 9.74,19.52 v10,19.26 | v15.91,22 v16.62,22.71
LEDA
  Bottom 0.127: J1.P$3 3.9,11.64 4.06,11.8 4.79,12.53 4.92,12.53 5.3,12.91 5.3,13.17 4.84,13.63 4.84,14.12 5.41,14.69 6.7,14.69 10.25,11.13 10.25,8.09 9.49,7.32 R9.2
LEDK  (via drill 0.3)
  Top 0.127: v4.07,15.03 5.17,13.93 5.17,12.84 5.51,12.5 5.51,12.19 v5.81,11.9
  Bottom 0.127: v5.81,11.9 5.81,11.52 6.06,11.26 Q1.3 | J1.P$2 3.01,11.9 3.01,12.15 3.4,12.54 3.4,12.9 3.31,12.99 3.31,13.82 3.89,14.39 3.89,14.62 4.07,14.8 v4.07,15.03
MISO  (via drill 0.3)
  Top 0.127: v23.97,21.04 23.97,20.79 24.1,20.66 24.1,17.64 17.59,11.13 14.44,11.13 | 14.44,11.13 14.06,10.75 14.06,10.25 IC5.33 | v13.68,12.79 14.44,12.02 14.44,11.13 | v23.97,21.04 v23.98,21.04 | v23.97,21.04 21.6,21.04 v21.52,20.95
  Bottom 0.127: D2.2 24.22,21.68 24.22,21.29 23.98,21.05 v23.98,21.04 | v13.68,12.79 12.79,13.67 12.79,15.07 J3.P7 | IC2.2 13.75,27.14 14.34,26.55 15.92,26.55 20.54,21.93 R8.2 v21.52,20.95
MOSI  (via drill 0.3)
  Top 0.127: IC5.31 12.41,10.25 12.41,11.39 13.17,12.15 13.17,14.56 v15.08,16.47 v13.05,18.5 | v4.28,7.2 4.28,7.45 3.9,7.83 3.9,8.21 4.28,8.59 v4.28,8.98 | v3.14,19.26 3.39,19.26 4.92,20.79 4.92,21.93 v5.3,22.31
  Bottom 0.127: 15.71,17.1 15.08,17.74 15.08,18.5 14.44,19.14 14.44,21.68 D3.2 | J3.P3 17.11,15.33 17.11,18.5 15.71,17.1 | 15.71,17.1 v15.08,16.47 | v4.28,7.2 5.1,7.2 5.93,7.2 J1.P$10 | v3.14,19.26 3.14,18.68 3.14,17.36 1.62,15.83 1.62,11.64 3.02,10.24 3.05,10.2 | IC2.5 5.3,24.6 v5.3,22.31 6.82,20.79 9.04,20.79 9.05,20.78 9.75,20.78 10.65,21.68 11.01,21.68 R6.2 11.14,21.68 13.05,19.77 v13.05,18.5 | 3.05,10.2 | 3.05,10.2 3.2,9.97 3.23,9.94 3.31,9.94 v4.28,8.98
N$3  (via drill 0.3)
  Top 0.127: v19.4,29.17 16.6,31.96 16.35,31.96 16.09,31.71 12.67,31.71 10.63,29.68 R1-USB.2 | v20.16,26.5 19.9,26.25 19.9,25.61 J2.A5
  Bottom 0.127: v19.4,29.17 19.4,27.26 v20.16,26.5
N$4
  Top 0.127: IC4.3 23.21,1.99 21.94,1.99 21.43,1.48 C1_BAT1.1 21.3,1.48 20.79,1.48 19.27,3.01 19.29,3.02 | 19.29,3.02 20.41,4.15 20.67,4.15 T1.2 20.79,4.15 21.17,3.77 22.32,3.77 IC4.1 | 19.29,3.02 D1.1
N$7
  Top 0.127: R6-ESP1.2 1.87,14.31 1.87,15.07 1.49,15.45 1.49,16.72 SJ1.1
N$9
  Bottom 0.127: R12.2 7.71,9.48 7.71,10.37 8.22,10.88 8.35,10.88 8.73,11.26 8.86,11.26 9.11,11.52 9.11,11.77 7.97,12.91 6.95,12.91 Q1.1 6.82,13.04 6.06,13.8 5.68,13.8 R11.1
N$10
  Top 0.127: R6-ESP1.1 3.27,13.93 4.03,13.17 4.03,12.66 R7-ESP1.2 4.83,11.77 4.83,10.52 SJ2.2
N$11  (via drill 0.3)
  Top 0.127: v26.51,28.66 26.51,27.9 R2-USB.1 | v23.33,28.66 21.68,28.66 19.65,26.63 17.74,26.63 17.39,26.28 17.17,26.28 16.98,26.1 16.98,25.61 J2.B5
  Bottom 0.127: v23.33,28.66 v26.51,28.66
N$12  (via drill 0.3)
  Top 0.127: v9.36,5.42 9.87,4.91 CHG_LED.C | v11.65,7.71 11.65,7.83 11.14,8.34 10,8.34 R1_BAT.2
  Bottom 0.127: v11.65,7.71 10.53,6.58 v9.36,5.42
N$13  (via drill 0.3)
  Top 0.127: v12.03,11.64 11.9,11.52 11.9,9.74 11.78,9.61 8.28,9.61 v6.96,8.3 | C1.1 7.08,10.37 7.08,10.02 6.66,9.6 v6.66,9.3 | IC6.1 7.84,16.21 8.09,15.96 8.23,15.96 v8.29,15.9
  Bottom 0.127: v12.03,11.64 8.35,15.33 8.35,15.85 v8.29,15.9 | v6.96,8.3 6.96,8.48 6.37,9.07 6.37,9.3 v6.66,9.3
N$16  (via drill 0.3)
  Top 0.127: v8.22,5.04 8.22,5.8 9.11,6.69 9.11,7.2 R1_BAT.1 | v8.98,4.02 9.36,4.02 9.62,3.77 10.89,3.77 11.14,3.51 11.4,3.51 12.28,2.63 12.28,1.99 MCP73831.1
  Bottom 0.127: v8.22,5.04 8.22,4.78 8.37,4.64 v8.98,4.02
N$17
  Top 0.3: D6.6 3.19,23.2 3.27,23.2 3.64,23.87 3.86,23.94 4.58,23.53 4.65,23.31 4.59,23.2 5.58,23.2
N$18
  Top 0.127: R2_BAT.2 18.38,7.32 18.13,7.32 17.36,6.56 17.36,5.25 16.96,4.85 16.96,4.73 16.01,3.77 13.17,3.77 12.41,4.53 MCP73831.5
PIN_LED  (via drill 0.3)
  Top 0.127: v10.51,11.52 10.63,11.39 11.27,11.39 IC5.30
  Bottom 0.127: v10.51,11.52 10.25,11.52 6.82,14.94 5.3,14.94 4.57,14.21 4.57,13.22 R11.2
PPG_INT  (via drill 0.3)
  Top 0.127: v16.09,9.36 16.48,9.74 16.48,10.12 IC5.36 | v17.11,30.57 v17.11,26.95 | v20.93,22.69 19.77,21.53 v19.33,21.53
  Bottom 0.127: v17.11,30.57 17.87,30.57 18.51,31.2 TP8.TP | v16.09,9.36 16.09,9.55 16.32,9.77 16.32,9.94 19.87,13.49 19.87,20.59 19.33,21.13 v19.33,21.53 | v17.11,26.95 20.92,23.14 v20.92,22.69 v20.93,22.69
RESET  (via drill 0.3)
  Top 0.127: 27.52,4.66 27.52,5.29 BUTTON3.P$1 27.65,5.42 27.65,6.69 | 27.52,4.66 R1-ESP.1 | 27.52,4.66 27.78,4.4 28.54,4.4 BUTTON3.P$2 | 30.57,8.21 31.46,7.32 BUTTON3.P$4 | 27.65,6.69 27.78,6.56 28.41,6.56 | 27.65,6.69 v24.98,9.36 24.6,9.74 24.6,9.86 24.35,10.12 IC5.45 | 28.41,6.56 29.3,7.45 C5.1 29.43,7.58 30.06,8.21 30.57,8.21 | 28.41,6.56 C5.2 | 30.57,8.21 BUTTON3.P$3
  Bottom 0.127: TP9.TP 17.62,29.17 17.62,27.95 22.27,23.29 22.27,23.25 22.99,22.52 22.99,11.35 v24.98,9.36
RX  (1 unrouted)
SCK  (via drill 0.3)
  Top 0.127: 13.17,10.12 12.41,9.36 8.88,9.36 7.62,8.1 v7.61,8.1 | v2.63,9.99 2.12,10.5 2.12,12.96 v2.04,13.04 | v13.68,12.15 13.68,10.75 13.17,10.25 IC5.32 13.17,10.12 | 13.17,10.12 v13.94,9.36 | v19.98,7.12 v19.27,7.83
  Bottom 0.127: 21.43,2.88 20.92,2.37 R5.2 | D4.2 23.97,2.75 23.97,3.97 23.63,4.31 22.86,4.31 21.43,2.88 | v2.63,9.99 4.66,7.96 6.06,7.96 J1.P$9 6.6,8.08 6.79,7.88 7.4,7.88 v7.61,8.1 | IC2.6 5.3,25.87 4.79,25.36 4.66,25.36 3.63,24.33 3.63,14.63 v2.04,13.04 | v13.68,12.15 14.82,13.29 14.82,15.07 J3.P5 | v19.27,7.83 15.46,7.83 v13.94,9.36 | 21.43,2.88 19.98,4.33 v19.98,7.12
SCL  (via drill 0.3)
  Top 0.127: v12.92,22.95 14.06,24.09 IC5.13 | v8.98,17.23 7.46,17.23 7.2,16.98 7.2,16.34 IC6.2 | v16.48,31.45 16.22,31.45 14.82,30.06 14.82,28.91 13.91,28 12.39,28 v12.33,27.94 | IC3.8 9.45,21.57 v9.4,21.62
  Bottom 0.127: 12.67,22.95 v12.92,22.95 13.81,22.06 13.81,18.25 12.28,16.72 10.25,16.72 9.74,17.23 v8.98,17.23 | v16.48,31.45 16.48,33.49 TP6.TP | 12.67,22.95 12.67,23.83 11.98,24.52 11.98,25.08 11.98,27.79 12.06,27.86 12.25,27.86 v12.33,27.94 | 12.67,22.95 10.59,22.95 9.54,21.89 9.4,21.89 v9.4,21.62
SDA  (via drill 0.3)
  Top 0.127: IC6.3 6.82,16.09 6.82,15.58 7.08,15.33 8.35,15.33 9.49,16.47 9.49,19.9 IC3.9 9.49,20.02 9.49,20.41 10.13,21.04 10.13,21.49 9.41,22.2 v9.3,22.2 | 14.82,24.85 14.82,28.53 15.71,29.42 v15.71,30.31 | 14.82,24.85 14.82,24.22 IC5.12 | 14.82,24.85 12.28,24.85 11.65,25.49 v11.31,25.49
  Bottom 0.127: v15.71,30.31 15.71,31.84 14.19,33.36 TP7.TP | v11.31,25.49 11.31,24.93 11.31,24.33 9.3,22.31 v9.3,22.2
SS
  Bottom 0.127: D5.2 13.55,2.24 12.92,1.61 11.78,1.61 11.14,2.24 11.14,2.5 R4.2
SS_FLASH  (via drill 0.3)
  Top 0.127: v12.16,23.45 12.16,22.18 11.78,21.8 11.65,21.8 11.4,21.55 IC5.18
  Bottom 0.127: v12.16,23.45 12.16,23.96 11.73,24.39 11.73,27.93 12.21,28.41 13.05,28.41 IC2.1
SS_SD  (via drill 0.3)
  Top 0.127: IC5.7 19.14,24.09 19.14,22.76 v18.81,22.44
  Bottom 0.127: J3.P2 18.25,14.94 18.25,15.58 18.92,16.25 18.92,21.34 18.91,21.35 18.91,22.34 v18.81,22.44
SS_TFT  (1 unrouted)
TFT_DC  (via drill 0.3)
  Top 0.127: IC5.22 11.27,18.12 10.63,17.48 10.63,17.23 6.28,12.87 v5.73,12.87
  Bottom 0.127: J1.P$7 5.3,9.36 4.66,9.99 4.49,9.99 4.19,10.29 4.19,11.34 v5.73,12.87
TX  (via drill 0.3)
  Top 0.127: IC5.39 19.14,10.21 19.14,12.33 24.48,17.66 v24.48,23.33
  Bottom 0.127: v24.48,23.33 24.48,26.88 22.7,28.66 22.7,29.8 19.02,33.49 TP12.TP
VBAT  (via drill 0.3)
  Top 0.127: 15.59,1.23 C2_BAT.1 15.62,1.23 | 14.32,1.86 MCP73831.3 | 19.78,6.18 T1.3 | 2.63,15.96 SJ1.2
  Top 0.3: T1.3 18.59,5.08 | 18.59,5.08 18.5,5.08 | 18.59,5.08 18.44,4.93 18.32,4.93 17.73,4.34 17.73,4.04 17.57,3.87 v17.36,3.87 | 15.75,1.05 C2_BAT.1 | v17.11,1.28 17.11,0.58 16.22,0.58 C2_BAT.1 | C2_BAT.1 14.83,1.97 MCP73831.3 | v8.09,31.33 9.53,31.33 10.29,30.57 v10.63,30.57 | v2.63,17.48 2.63,15.94 SJ1.2
  Bottom 0.127: 15.08,29.3 15.33,29.04 TP5.TP 16.22,28.91 | 22.57,22.56 22.57,22.38
  Bottom 0.3: v8.09,31.33 7.6,31.33 7.28,31.65 7.2,31.65 3.9,28.35 3.9,26.73 1.85,24.68 1.85,18.55 2.43,17.98 2.75,17.98 | 2.75,17.98 2.78,18 | v2.63,17.48 2.63,17.86 2.75,17.98 | v10.63,30.57 10.65,30.55 10.65,30.51 11.63,29.53 14.85,29.53 15.08,29.3 | TP5.TP 16.93,27.45 17.63,27.45 21.93,23.15 21.93,22.95 22.31,22.57 22.39,22.57 22.55,22.41 | 22.55,22.41 22.55,22.4 22.57,22.38 | 22.55,22.41 22.57,22.39 22.57,10.42 17.88,5.73 17.2,5.73 17.15,5.68 17.15,3.83 17.36,3.62 | 17.36,3.62 17.36,1.54 v17.11,1.28 | 17.36,3.62 v17.36,3.87
VBUS  (via drill 0.3)
  Top 0.127: 17.26,3 D1.2 | 18.76,4.15 T1.1 18.89,4.28 | 19.27,0.97 19.28,0.97 R1_PWRUSB.2 | v8.73,3.26 8.86,3.13 9.36,3.13 CHG_LED.A | 14.19,4.66 MCP73831.4 14.32,4.66 | 1.11,19.26 C4_USB.1 | 2.76,25.61 C5_USB.1 | 9.87,27.52 PFMF.050.1.2 10,27.64 | 11.64,28.79 v11.75,28.79
  Top 0.3: C1_BAT.1 11.27,4.23 11.27,4.53 v10.76,5.04 11.37,5.04 11.77,5.44 12.59,5.44 12.94,5.34 13.62,4.66 14.19,4.66 | v16.73,9.36 16.73,8.75 | 16.73,8.75 17.14,8.34 19.49,8.34 20.8,7.03 20.8,5.88 19.83,4.9 19.4,4.9 18.83,4.33 T1.1 17.88,3.24 17.88,3.18 | 16.73,8.75 15.55,7.57 15.1,7.57 14.83,7.3 14.6,7.3 14.44,7.13 14.3,6.66 14.3,4.67 14.32,4.66 | 17.49,2.75 17.49,2.79 17.88,3.18 | 17.88,3.18 18.05,3.35 | D1.2 17.3,2.75 17.49,2.75 | 19.28,0.97 18.39,1.86 18.36,1.86 17.49,2.73 17.49,2.75 | v11.75,28.79 11.15,28.79 10,27.64 | PFMF.050.1.2 7.99,27.61 7.2,26.83 7.2,26.65 7.1,26.76 v6.7,26.76 | v2.76,24.76 2.76,25.71 C5_USB.1 2.77,24.74 2.76,24.72 | v2.76,24.76 2.76,24.72 | 1.11,19.26 0.9,19.47 0.9,20.97 0.98,21.05 0.98,22.08 1.43,22.53 1.43,22.83 1.33,22.93 1.33,22.95 1.68,23.3 1.68,23.78 2.58,24.68 2.68,24.68 v2.76,24.76 | 2.76,24.72 2.72,24.68
  Bottom 0.3: v6.7,26.76 6.32,26.37 4.41,26.37 2.79,24.76 v2.76,24.76 | v11.75,28.79 12.42,28.79 12.54,28.91 13.72,28.91 13.88,28.75 13.88,28.61 14.2,28.29 14.2,27.9 13.94,27.64 12.54,27.64 12.38,27.48 12.38,26.8 12.55,26.63 13.3,26.63 13.56,26.37 14.03,26.37 16.7,23.71 16.94,23.71 17.71,22.94 19.02,22.94 20,21.96 20,21.28 20.63,20.65 20.63,16.7 20.7,16.63 20.7,13.84 16.88,10.01 16.88,9.85 16.73,9.7 v16.73,9.36 | v10.76,5.04 10.76,4.98 9.2,3.43 8.9,3.43 v8.73,3.26
VIBE_OUT+  (via drill 0.3)
  Top 0.127: v12.16,12.28 12.16,15.96 v13.55,17.36
  Top 0.3: v14.57,18.37 14.57,18.92 16.28,20.63 16.68,20.63 16.75,20.55 17.68,20.55 18.38,19.85 20,19.85 20.6,20.45 20.6,20.75 21.73,21.88 22.38,21.88 22.83,22.32 22.83,23.24 v22.87,23.28 | v10.13,14.18 9.77,13.83 9.05,13.83 9.03,13.8 8.98,13.8 7.84,12.66 7.84,11.9 | 7.84,11.9 IC6.9 7.84,11.9
  Bottom 0.127: v12.16,12.28 12.03,12.28 | 20.92,28.91 TP1.TP
  Bottom 0.3: 12.03,12.28 v10.13,14.18 | v14.57,18.37 v13.55,17.36 | TP1.TP 22.83,26.98 22.83,23.32 v22.87,23.28
VIBE_OUT-  (via drill 0.3)
  Top 0.127: 6.82,11.77 IC6.7 | 20.63,14.65 20.95,14.98
  Top 0.3: v22.19,29.68 22.19,30.41 | 22.19,30.41 22.2,30.43 | v22.19,30.95 22.19,30.41 | 8.48,14.5 6.84,12.86 6.84,12.61 6.8,12.57 6.84,12.31 IC6.7 | 8.48,14.5 8.73,14.75 | 20.63,14.65 17.49,11.52 17.36,11.64 v14.95,11.64 | 20.95,14.98 23.52,17.54 23.57,17.59 v23.57,20.53 | v9.12,15.08 8.72,14.68 8.7,14.68 8.52,14.5 8.48,14.5
  Bottom 0.127: v14.95,11.64 13.55,11.64 10.12,15.08 v9.12,15.08 | 23.59,31.58 TP2.TP
  Bottom 0.3: v22.19,29.68 22.19,28.79 23.48,27.5 23.48,21.19 23.33,21.04 23.33,20.77 v23.57,20.53 | v22.19,30.95 22.88,31.64 TP2.TP
VUSB  (1 unrouted)
  Top 0.127: 16.22,25.49 16.35,25.49 16.36,25.49 J2.B4 | 16.22,25.49 16.09,25.49 J2.A9 16.22,25.49 | 21.3,23.71 21.3,23.95 | 16.22,23.6 16.22,25.49 | 10.63,21.6 10.63,21.68 | 7.08,24.09 PFMF.050.1.1 | 12.13,21.05 10.65,21.05
  Top 0.3: 7.47,23.78 8.47,22.77 8.79,22.77 8.86,22.7 9.8,22.7 10.63,21.87 10.63,21.6 10.63,21.07 | PFMF.050.1.1 7.8,24.21 8.23,23.78 7.47,23.78 | 7.47,23.78 7.35,23.9 | 12.13,21.05 12.51,21.43 14.62,21.43 16.02,22.83 | 16.02,22.83 16.02,22.6 16.41,22.21 16.41,22.09 16.92,21.58 18.67,21.58 20.42,23.33 21,23.33 21.25,23.08 21.3,23.12 21.3,23.95 21.3,25.39 J2.A4 | 16.02,22.83 16.22,23.03 16.22,23.6 | J2.A9 16.36,25.49